# Altium PCB Secondary-Board-v1.0.PcbDoc (part 1 of 3)
Units mm, origin at the board's own origin, x right, y up, seen from the top; angles counter-clockwise.
Board outline 160 x 120 mm, 4 copper layers (Top Layer, GND, PWR, Bottom Layer), stack 1.566 mm thick; 110 components, 60 nets, 340 pads, 181 vias.
Unrouted connection lines stored in the file: 32.
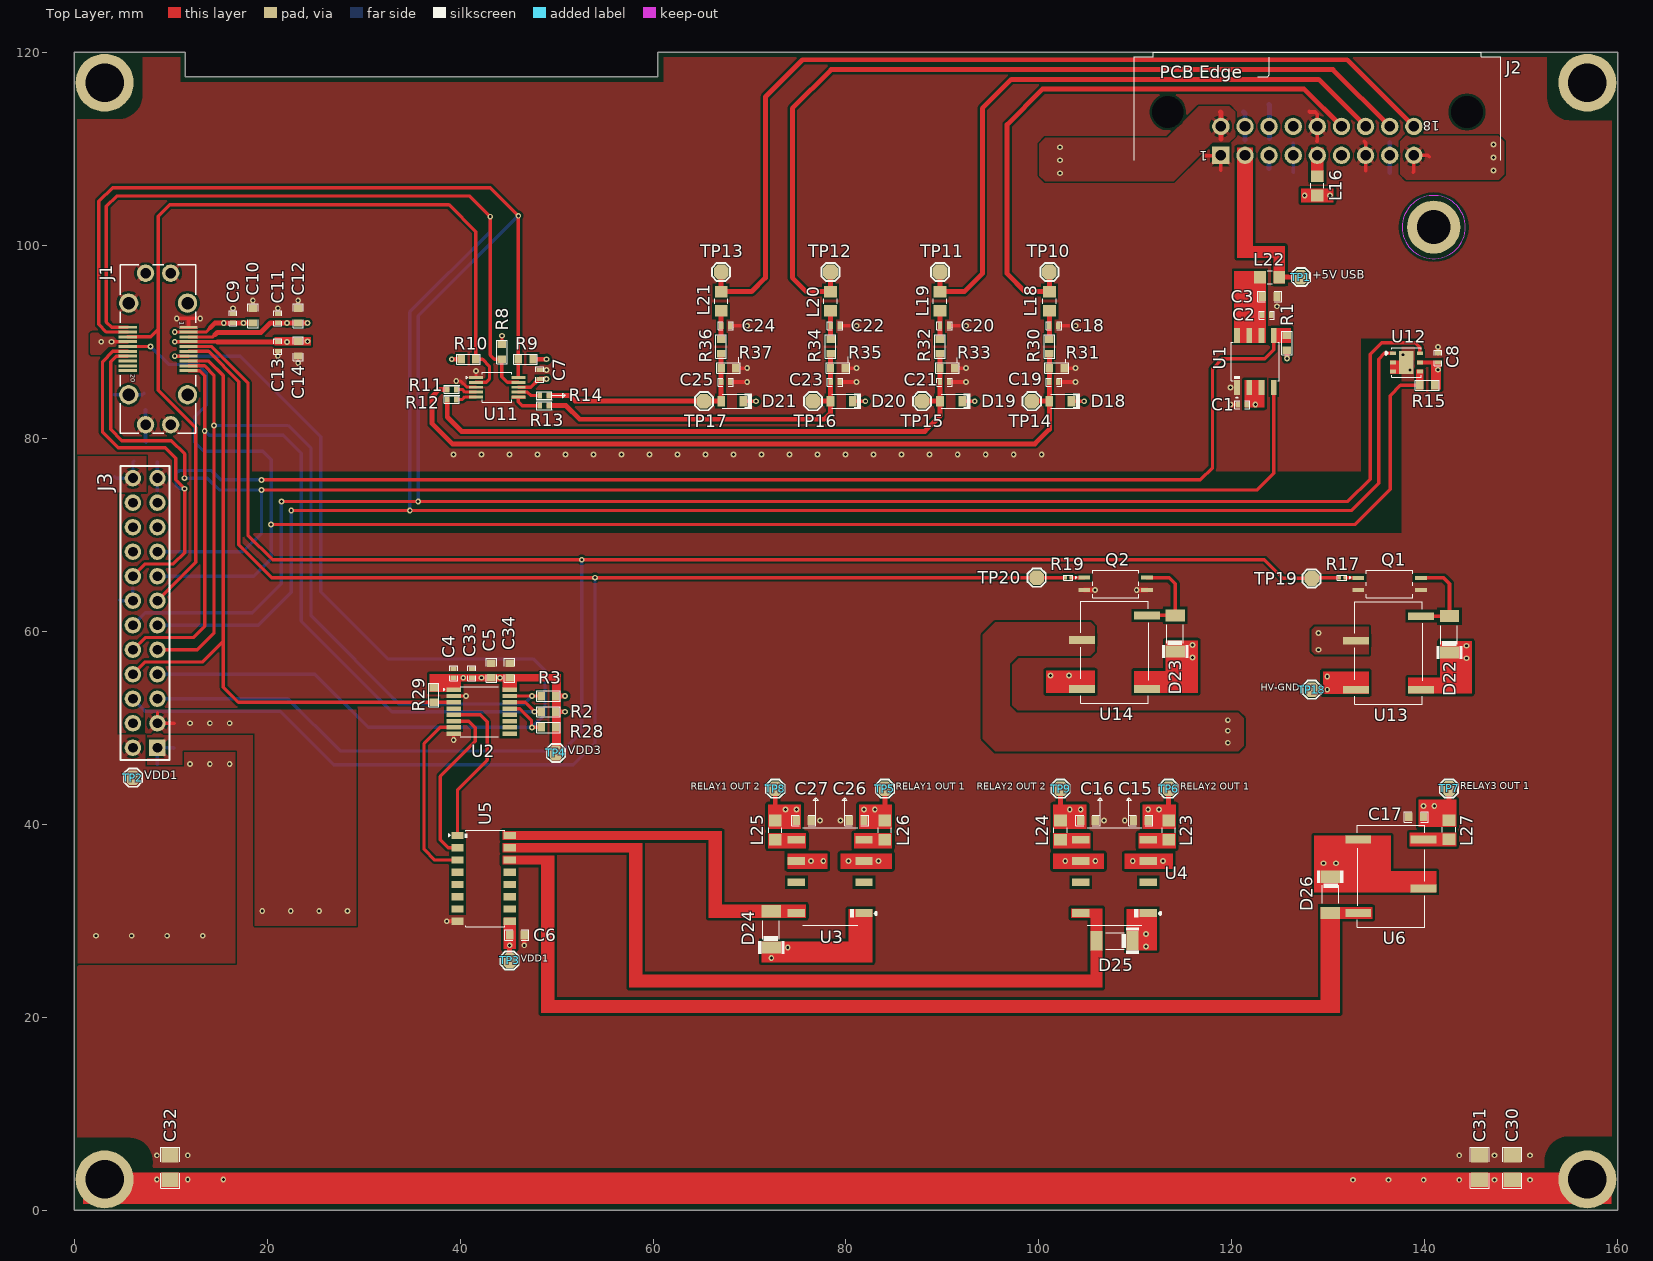
[diagram p0: Top Layer view]
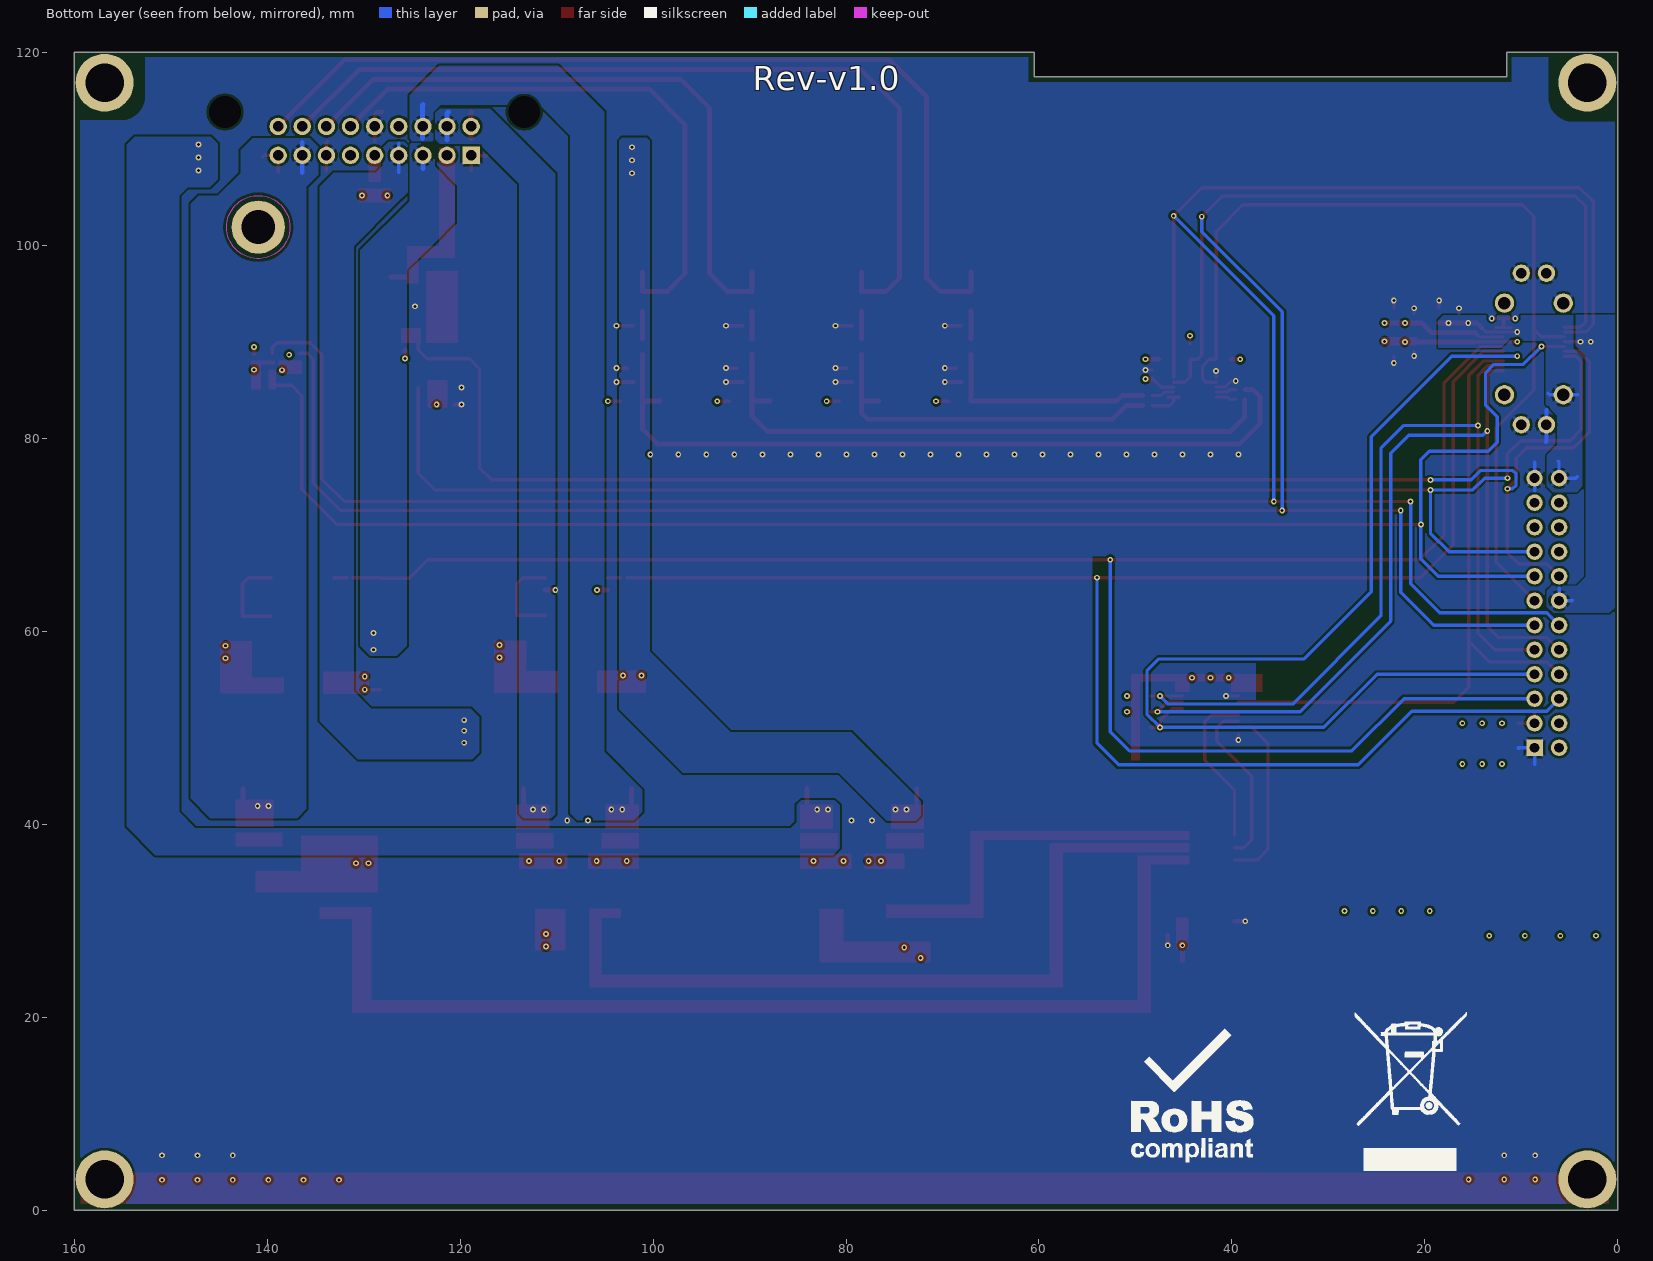
[diagram p1: Bottom Layer view, seen from below]
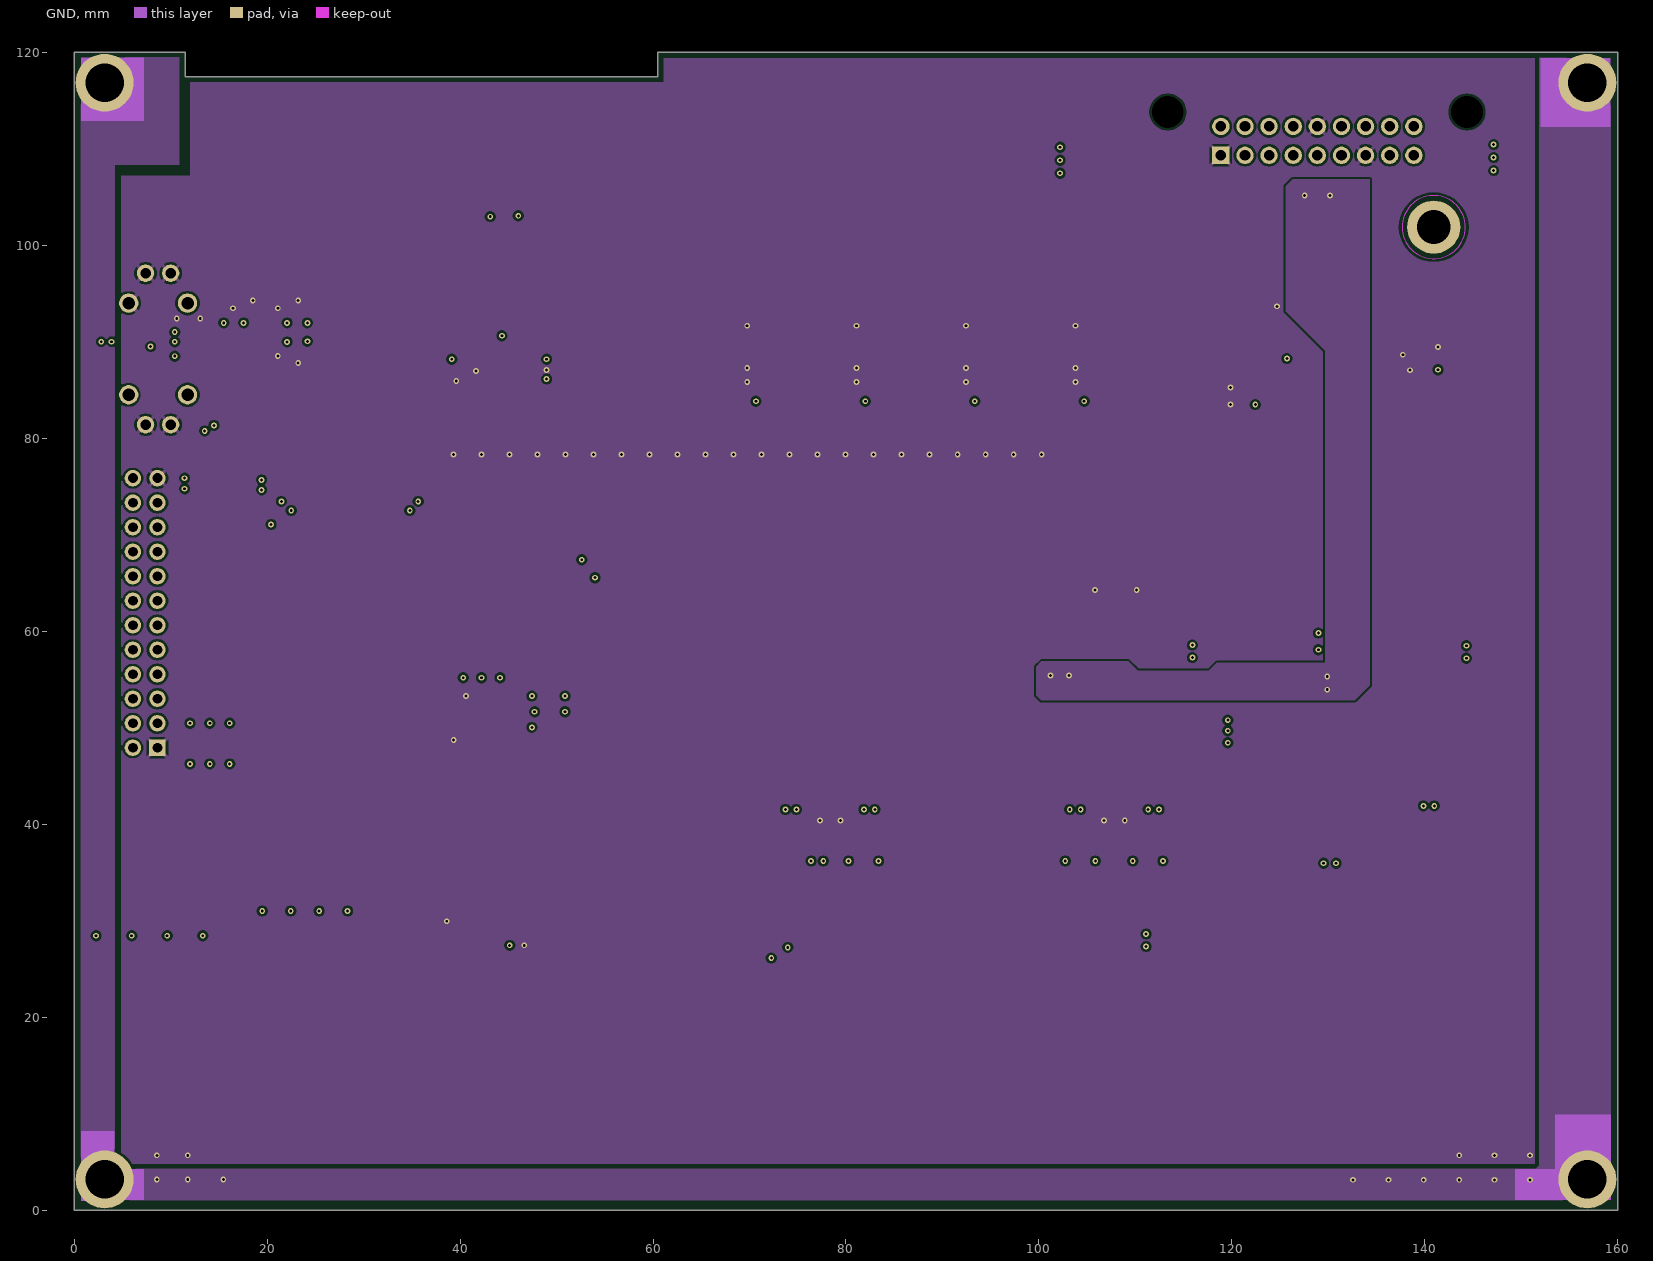
[diagram p2: GND]
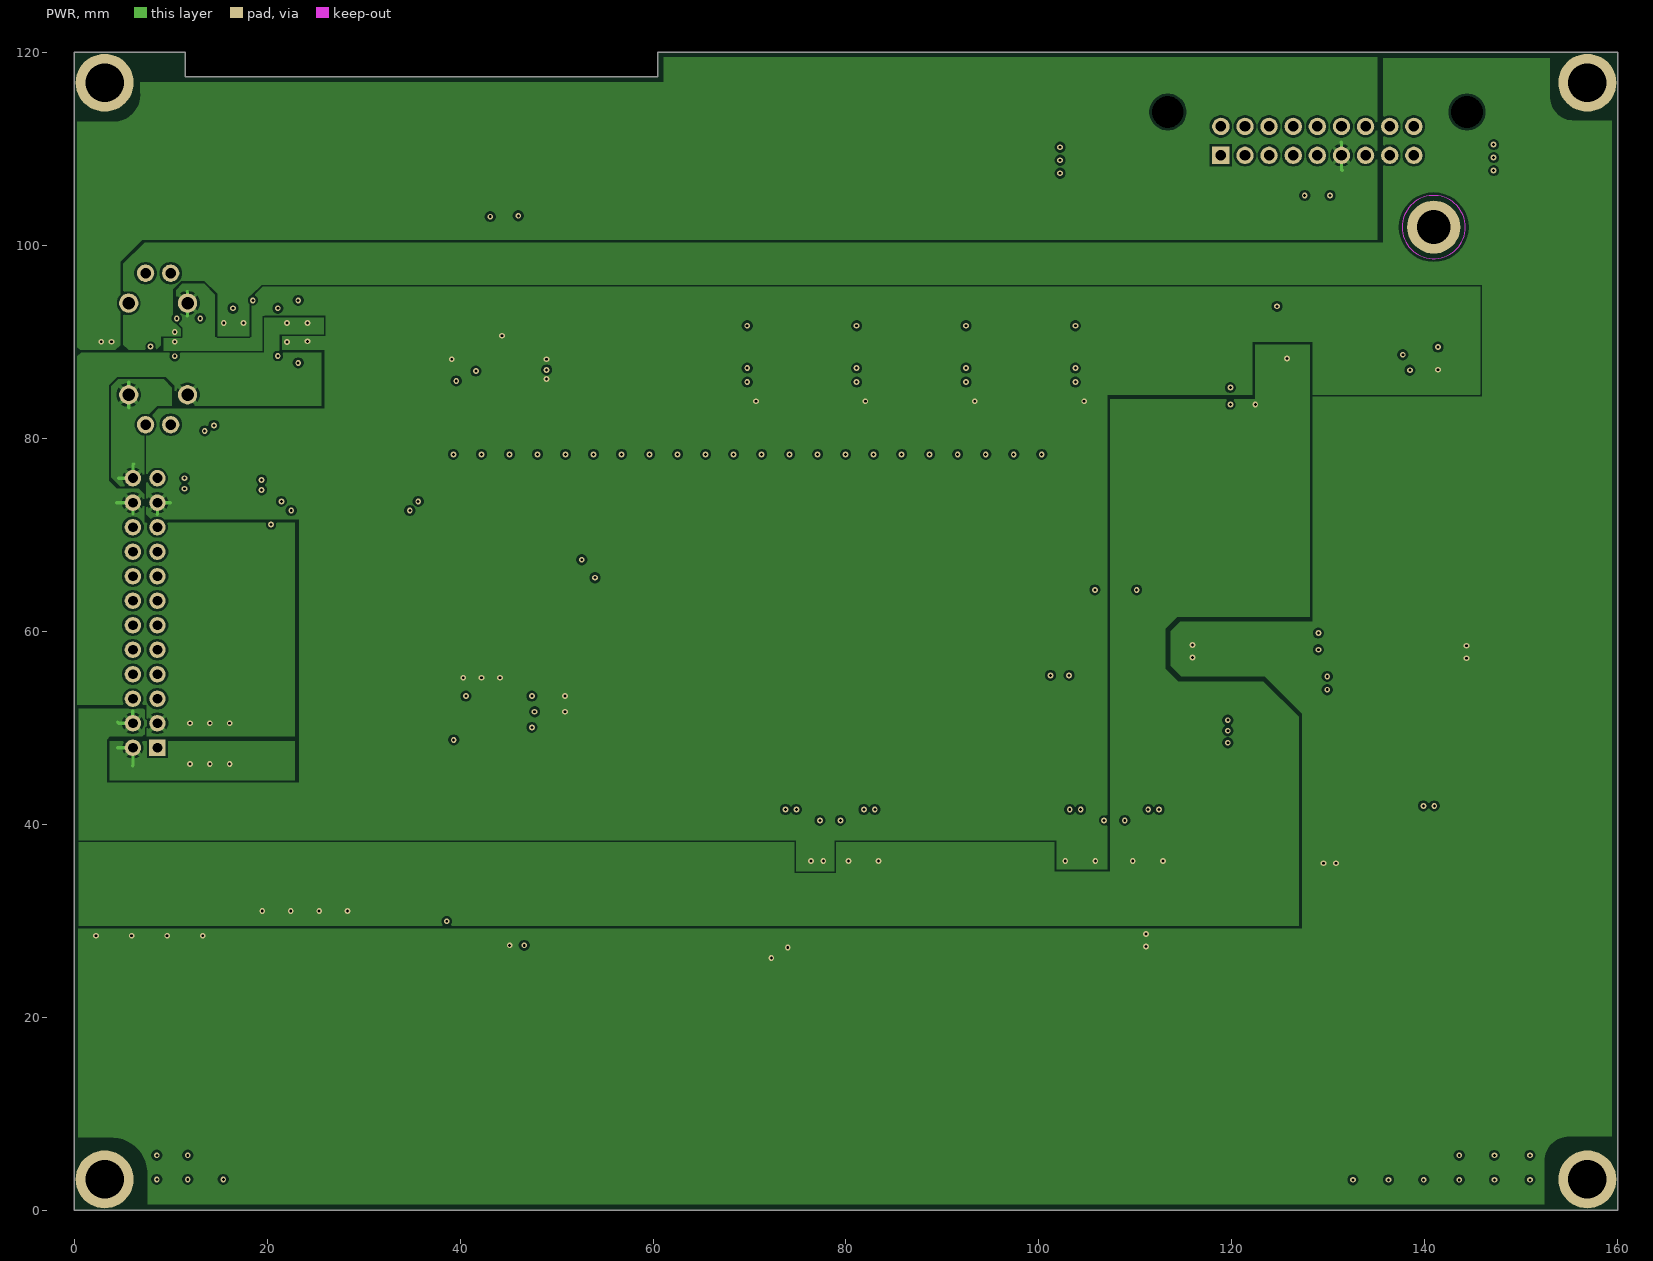
[diagram p3: PWR]
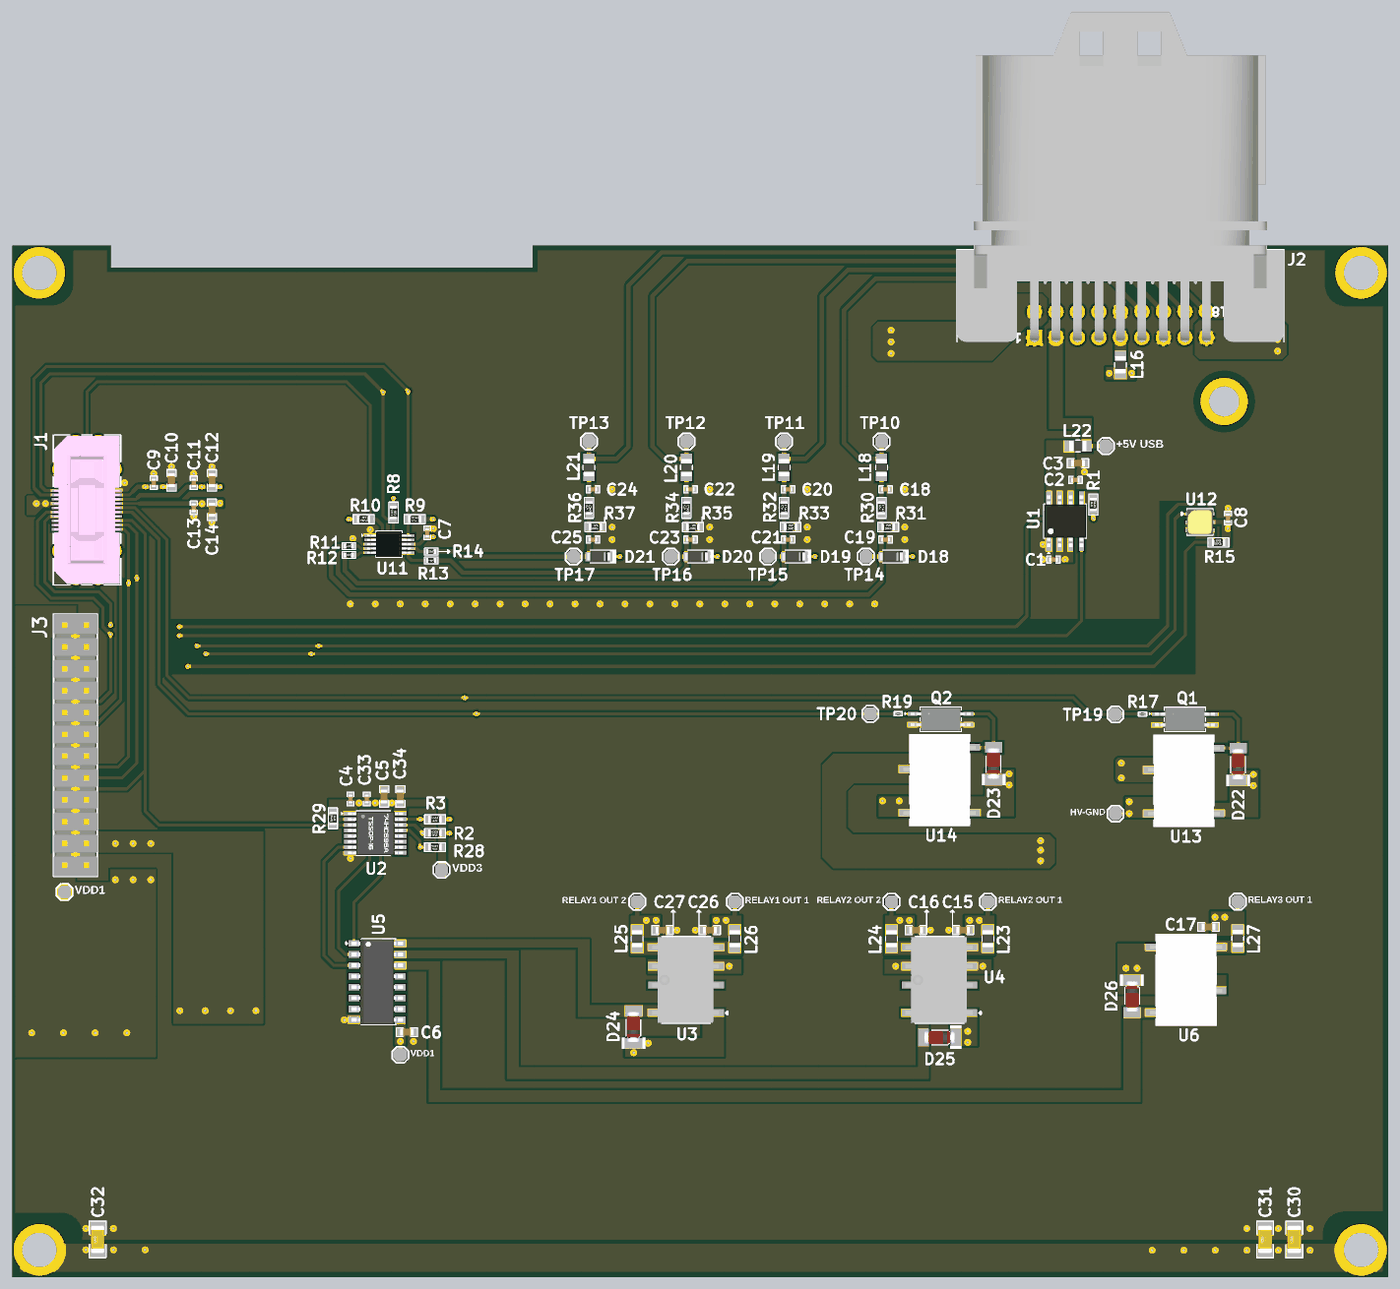
[diagram p5: 3D render of the assembled board from above, using the file's embedded part models]

## Layer stack, top to bottom
Top Solder: solder mask 0.0203, Solder Resist, Dk 3.5
Top Layer: signal copper 0.035
Dielectric 2: prepreg 0.203, PP-022, Dk 4.4
GND: signal copper 0.03
Dielectric 1: core 1.03, FR-4, Dk 4.6
PWR: signal copper 0.03
Dielectric 3: prepreg 0.203, PP-022, Dk 4.4
Bottom Layer: signal copper 0.035
Bottom Solder: solder mask 0.0203, Solder Resist, Dk 3.5

## Board outline
0,0 0,120 11.5,120 11.5,117.45 60.5,117.45 60.5,120 160,120 160,0

## Design rules (kind name [scope] priority, off if disabled: settings)
Clearance [All] p1: gap=0.254 ignorepadtopadclearanceinfootprint=TRUE except(0: Arc-Hole Track-Hole SMDPad-Hole THPad-Hole Via-Hole Fill-Hole Poly-Hole Region-Hole Text-Hole; 0.127: Track-Track Track-SMDPad Track-Fill SMDPad-Fill; 0.178: SMDPad-SMDPad; 0.203: Track-THPad Poly-Poly)
HoleSize [All] p1: absolutevalues=TRUE maxlimit=5.08 minlimit=0.025 maxpercent=80.000 minpercent=20.000
MinimumSolderMaskSliver [All] p1: minsoldermaskwidth=0
PolygonConnect [All] p1: thpad.connectstyle=Relief thpad.reliefconductorwidth=0.381 thpad.reliefentries=4 thpad.polygonreliefangle="45 Angle" thpad.airgapwidth=0.254 smdpad.connectstyle=Direct smdpad.reliefconductorwidth=0.381 smdpad.reliefentries=4 smdpad.polygonreliefangle="45 Angle" smdpad.airgapwidth=0.254 via.connectstyle=Direct via.reliefconductorwidth=0.381 via.reliefentries=4 via.polygonreliefangle="45 Angle" via.airgapwidth=0.254
RoutingVias [All] p1: holewidth=0.3 width=0.6 viastyle="Through Hole" minholewidth=0.3 minwidth=0.6 maxholewidth=0.3 maxwidth=0.6
SilkToSilkClearance [All] p1: silktosilkclearance=0
SilkToSolderMaskClearance [IsPad] p1: minsilkscreentomaskgap=0 clearancetoexposedcopper=TRUE
SolderMaskExpansion [All] p1: expansion=0.102 istentingtop=FALSE
UnRoutedNet [All] p1: checkbadconnections=TRUE
Width [All] p1: maxlimit=1.27 minlimit=0.254 preferedwidth=0.345 minimp=50.000000 maximp=50.000000 favimp=50.000000
25 further rules are at their usual default settings.

## Classes and differential pairs
component class U_TEMP-HUMIDITY: C7 C8 C18 C19 C20 C21 C22 C23 C24 C25 D18 D19 D20 D21 L18 L19 L20 L21 R8 R9 R10 R11 R12 R13 R14 R15 R30 R31 R32 R33 R34 R35 R36 R37 TP10 TP11 TP12 TP13 TP14 TP15 TP16 TP17 U11 U12
component class U_ISOLATED-RELAYS: C30 C31 C32 D22 D23 Q1 Q2 R17 R19 TP18 TP19 TP20 U13 U14
component class U_I2C-To-GPIO-Expander: C4 C5 C6 C15 C16 C17 C26 C27 C33 C34 D24 D25 D26 L23 L24 L25 L26 L27 R2 R3 R28 R29 TP4 TP5 TP6 TP7 TP8 TP9 U2 U3 U4 U5 U6
component class U_Connector-USB-Current-Limit: C1 C2 C3 C9 C10 C11 C12 C13 C14 J1 J2 J3 L16 L22 R1 TP1 TP2 TP3 U1

## Components (designator, comment, footprint, x,y, rotation, side; value= is the part's Value field where it differs from the comment)
C1 "0.1uF" Cap-0402 121.063,83.47 r0 top value=100nF
C2 "0.1uF" Cap-0402 123.616,92.741 r180 top value=100nF
C3 "22uF" Cap-0603 123.908,94.671 r180 top
C4 "0.1uF" Cap-0402 39.34,55.626 r270 top value=100nF
C5 "1uF" Cap-0603 43.249,55.918 r270 top
C6 "0.1uF" Cap-0603 45.898,28.499 r0 top value=100nF
C7 "0.1uF" Cap-0402 48.26,86.588 r90 top value=100nF
C8 "0.1uF" Cap-0402 141.351,88.303 r90 top value=100nF
C9 "0.1uF" Cap-0402 16.472,92.401 r270 top value=100nF
C10 "1uF" Cap-0603 18.529,92.693 r270 top
C11 "0.1uF" Cap-0402 21.12,92.401 r270 top value=100nF
C12 "1uF" Cap-0603 23.228,92.693 r270 top
C13 "0.1uF" Cap-0402 21.12,89.497 r90 top value=100nF
C14 "1uF" Cap-0603 23.228,89.264 r90 top
C15 "0.1uF" Cap-0603 110.556,40.369 r180 top value=100nF
C16 "0.1uF" Cap-0603 105.08,40.369 r0 top value=100nF
C17 "0.1uF" Cap-0603 139.082,40.742 r180 top value=100nF
C18 "0.1uF" Cap-0402 101.548,91.643 r180 top value=100nF
C19 "0.1uF" Cap-0402 101.548,85.801 r180 top value=100nF
C20 "0.1uF" Cap-0402 90.208,91.643 r180 top value=100nF
C21 "0.1uF" Cap-0402 90.208,85.801 r180 top value=100nF
C22 "DNP" Cap-0402 78.868,91.643 r180 top value=100nF
C23 "DNP" Cap-0402 78.868,85.801 r180 top value=100nF
C24 "DNP" Cap-0402 67.529,91.643 r180 top value=100nF
C25 "DNP" Cap-0402 67.529,85.801 r180 top value=100nF
C26 "0.1uF" Cap-0603 81.097,40.369 r180 top value=100nF
C27 "0.1uF" Cap-0603 75.621,40.369 r0 top value=100nF
C30 "1nF" Cap-1206 149.053,4.394 r90 top
C31 "DNP" Cap-1206 145.669,4.394 r90 top value=1nF
C32 "DNP" Cap-1206 9.957,4.394 r90 top value=1nF
C33 "0.1uF" Cap-0402 41.231,55.626 r270 top value=100nF
C34 "1uF" Cap-0603 45.14,55.918 r270 top
D18 "RRE07VTM6SFHTR" TUMD2SM 102.228,83.82 r180 top
D19 "RRE07VTM6SFHTR" TUMD2SM 90.888,83.82 r180 top
D20 "RRE07VTM6SFHTR" TUMD2SM 79.548,83.82 r180 top
D21 "RRE07VTM6SFHTR" TUMD2SM 68.209,83.82 r180 top
D22 "LL4148-GS08" "SOD-80 MiniMELF" 142.545,59.669 r90 top
D23 "LL4148-GS08" "SOD-80 MiniMELF" 114.122,59.745 r90 top
D24 "LL4148-GS08" "SOD-80 MiniMELF" 72.263,29.088 r90 top
D25 "LL4148-GS08" "SOD-80 MiniMELF" 107.823,27.915 r180 top
D26 "LL4148-GS08" "SOD-80 MiniMELF" 130.175,32.66 r270 top
J1 "FX23-20S-0.5SV" FX23-20S-0.5SV 8.712,89.235 r270 top locked
J2 "MX23A18NF1" MX23A18NF1 113.348,113.8 r180 top locked
J3 "TSW-112-15-G-D" TSW-112-15-G-D 7.366,61.874 r90 top locked
L16 "BLM21SP601SH1D" Ind-0805 128.848,106.137 r90 top
L18 "MPZ2012S102AT000" Ind-0805 101.078,94.174 r270 top
L19 "MPZ2012S102AT000" Ind-0805 89.738,94.174 r270 top
L20 "DNP" Ind-0805 78.398,94.174 r270 top
L21 "DNP" Ind-0805 67.059,94.174 r270 top
L22 "BLM21SP601SH1D" Ind-0805 123.908,96.678 r0 top
L23 "BLM21AG121SZ1D" Ind-0805 113.436,39.369 r90 top value=90mR
L24 "BLM21AG121SZ1D" Ind-0805 102.235,39.369 r90 top value=90mR
L25 "BLM21AG121SZ1D" Ind-0805 72.669,39.369 r90 top value=90mR
L26 "BLM21AG121SZ1D" Ind-0805 84.023,39.369 r90 top value=90mR
L27 "BLM21AG121SZ1D" Ind-0805 142.494,39.405 r90 top value=90mR
Q1 "TLX9000(TPL,F" "4-SOIC (0.179\", 4.55mm Width)" 136.34,64.872 r0 top
Q2 "TLX9000(TPL,F" "4-SOIC (0.179\", 4.55mm Width)" 107.951,64.897 r0 top
R1 "DNP" Res-0603 125.698,89.871 r270 top value=10kR
R2 "10K" Res-0603 49.174,51.638 r0 top value=10kR
R3 "10K" Res-0603 49.174,53.263 r0 top value=10kR
R8 "10K" Res-0603 44.34,88.933 r90 top value=10kR
R9 "10K" Res-0603 46.802,88.171 r0 top value=10kR
R10 "10K" Res-0603 40.876,88.171 r180 top value=10kR
R11 "0R" Res-0402 39.141,85.039 r180 top value=0mR
R12 "0R" Res-0402 39.141,83.998 r180 top value=0mR
R13 "0R" Res-0402 48.73,83.363 r0 top value=0mR
R14 "0R" Res-0402 48.73,84.418 r0 top value=0mR
R15 "10K" Res-0603 140.236,85.471 r180 top value=10kR
R17 "330R" Res-0201 131.417,65.507 r0 top
R19 "330R" Res-0201 103.028,65.532 r0 top
R28 "10K" Res-0603 49.174,50.013 r0 top value=10kR
R29 "10K" Res-0603 37.286,53.375 r90 top value=10kR
R30 "47K" Res-0603 101.078,89.484 r270 top value=47kR
R31 "10K" Res-0603 101.84,87.249 r180 top value=10kR
R32 "47K" Res-0603 89.738,89.484 r270 top value=47kR
R33 "10K" Res-0603 90.5,87.249 r180 top value=10kR
R34 "DNP" Res-0603 78.398,89.484 r270 top value=47kR
R35 "DNP" Res-0603 79.16,87.249 r180 top value=10kR
R36 "DNP" Res-0603 67.059,89.484 r270 top value=47kR
R37 "DNP" Res-0603 67.821,87.249 r180 top value=10kR
TP1 "TEST POINT" Test-point 127.146,96.678 r90 top
TP2 "TEST POINT" Test-point 6.096,44.806 r0 top
TP3 "TEST POINT" Test-point 45.143,25.857 r270 top
TP4 "TEST POINT" Test-point 49.936,47.371 r0 top
TP5 "TEST POINT" Test-point 84.023,43.663 r0 top
TP6 "TEST POINT" Test-point 113.436,43.663 r0 top
TP7 "TEST POINT" Test-point 142.494,43.688 r0 top
TP8 "TEST POINT" Test-point 72.669,43.663 r0 top
TP9 "TEST POINT" Test-point 102.235,43.663 r0 top
TP10 "TEST POINT" Test-point 101.078,97.206 r90 top
TP11 "TEST POINT" Test-point 89.738,97.206 r180 top
TP12 "TEST POINT" Test-point 78.398,97.206 r180 top
TP13 "TEST POINT" Test-point 67.059,97.206 r180 top
TP14 "TEST POINT" Test-point 99.249,83.82 r90 top
TP15 "TEST POINT" Test-point 87.884,83.82 r180 top
TP16 "TEST POINT" Test-point 76.581,83.82 r180 top
TP17 "TEST POINT" Test-point 65.278,83.82 r180 top
TP18 "TEST POINT" Test-point 128.27,53.924 r90 top
TP19 "TEST POINT" Test-point 128.253,65.456 r90 top
TP20 "TEST POINT" Test-point 99.764,65.532 r90 top
U1 "TPS2024IDRQ1" SOIC-8 122.422,87.933 r90 top
U2 "TCA6408AQPWRQ1" TSSOP_16 42.24,51.638 r0 top
U3 "G6K-2F-Y DC12" "G6K-2F-Y DC12" 78.359,34.569 r180 top
U4 "G6K-2F-Y DC12" "G6K-2F-Y DC12" 107.818,34.569 r180 top
U5 "TPL7407LADR" 16-SOIC 42.443,34.366 r0 top
U6 "G6L-1FDC12" G6L-1FDC12 136.474,34.595 r180 top
U11 "ADS1015IDGSR" 10-VSSOP 43.84,85.268 r0 top
U12 "HDC2021DEBT" HDC2021DEBT 138.074,87.833 r0 top
U13 "G6L-1FDC12" G6L-1FDC12 136.22,57.734 r0 top
U14 "G6L-1FDC12" G6L-1FDC12 107.831,57.81 r0 top

## Footprints (in the part's own frame and the unit in brackets; to place one, negate y for a bottom-side part, rotate by r counter-clockwise, add the part's x,y. Pads: shape width x height; smd on the part's side, far side on the other; paste and mask are expansions set on the pad)
"4-SOIC (0.179\", 4.55mm Width)" [mm]
  rect 1.211x0.431 smd: 1(-3.25,0.635) 2(-3.25,-0.635) 3(3.25,-0.635) 4(3.25,0.635)
  silkscreen extent -4.14,-1.43 2.4,1.43, body extent -3.5,-1.3 3.5,1.3, height 2.6
10-VSSOP [mm]
  rect 1.45x0.3 smd: 1(-2.2,1) 2(-2.2,0.5) 3(-2.2,0) 4(-2.2,-0.5) 5(-2.2,-1) 6(2.2,-1) 7(2.2,-0.5) 8(2.2,0) 9(2.2,0.5) 10(2.2,1)
  silkscreen extent -3.17,-1.55 1.52,1.55, body extent -2.56,-1.5 2.51,1.5, height 1.09
16-SOIC [mm]
  rect 1.27x0.76 smd: 1(-2.7,4.445) 2(-2.7,3.175) 3(-2.7,1.905) 4(-2.7,0.635) 5(-2.7,-0.635) 6(-2.7,-1.905) 7(-2.7,-3.175) 8(-2.7,-4.445) 9(2.7,-4.445) 10(2.7,-3.175) 11(2.7,-1.905) 12(2.7,-0.635) 13(2.7,0.635) 14(2.7,1.905) 15(2.7,3.175) 16(2.7,4.445)
  silkscreen extent -3.61,-5 2.18,5, body extent -3,-4.95 3,4.95, height 1.75
Cap-0402 [mil]
  rect 18x25 smd mask+2.36: 1(-18.5,0) 2(18.5,0)
  silkscreen extent -31,-16 31,16, body extent -20,-10 20,10, height 19
Cap-0603 [mil]
  rect 30x35 smd mask+2.36: 1(-30,0) 2(30,0)
  silkscreen extent -49,-21 49,21, body extent -32,-16 31,16, height 34
Cap-1206 [mil] "SMD 1206"
  rect 60x70 smd: 1(-50,0) 2(50,0)
  silkscreen extent -84,-39 84,39, body extent -63,-31 63,32, height 39
FX23-20S-0.5SV [mm]
  rect 0.305x1.905 smd: 1(-2.25,3.15) 2(-1.75,3.15) 3(-1.25,3.15) 4(-0.75,3.15) 5(-0.25,3.15) 6(0.25,3.15) 7(0.75,3.15) 8(1.25,3.15) 9(1.75,3.15) 10(2.25,3.15) 11(-2.25,-3.15) 12(-1.75,-3.15) 13(-1.25,-3.15) 14(-0.75,-3.15) 15(-0.25,-3.15) 16(0.25,-3.15) 17(0.75,-3.15) 18(1.25,-3.15) 19(1.75,-3.15) 20(2.25,-3.15)
  round 2 hole 1.295: P1(-4.75,3.05) P2(4.75,3.05) P3(-4.75,-3.05) P4(4.75,-3.05)
  round 1.8 hole 1.092: SH1(-7.85,1.3) SH2(7.85,1.3) SH3(-7.85,-1.3) SH4(7.85,-1.3)
  silkscreen extent -8.72,-3.92 8.72,3.92, body extent -8.6,-3.8 8.6,3.8, height 6.8
"G6K-2F-Y DC12" [mm]
  rect 1.8x0.8 smd: 1(-3.5,3.8) 2(-3.5,0.6) 3(-3.5,-1.6) 4(-3.5,-3.8) 5(3.5,-3.8) 6(3.5,-1.6) 7(3.5,0.6) 8(3.5,3.8)
  silkscreen extent -4.78,-5.05 2.82,5.05, body extent -3.84,-5 3.96,5, height 5.2
G6L-1FDC12 [mm]
  rect 2.66x0.8 smd: 2(-3.37,1.27) 4(-3.37,-3.81) 5(3.37,-3.81) 8(3.37,3.81)
  silkscreen extent -3.5,-5.3 3.51,5.3, body extent -4.2,-5.3 4.2,5.3, height 4.2
HDC2021DEBT [mm]
  rect 0.6x0.4 smd: 1(-1.4,0.95) 2(-1.4,0) 3(-1.4,-0.95) 4(1.4,-0.95) 5(1.4,0) 6(1.4,0.95)
  rect 1.5x2.4 smd: 7(0,0)
  silkscreen extent -2.11,-1.55 1.52,1.55, body extent -1.5,-1.5 1.5,1.5, height 0.87
Ind-0805 [mm] "Inductor 0805"
  rect 1.2x1.32 smd: 1(-1,0) 2(1,0)
  silkscreen extent -0.25,-0.69 0.25,0.69, body extent -1,-0.62 1,0.63, height 0.47
MX23A18NF1 [mm]
  rect 1.8x1.8 hole 1.1: 1(-5.5,4.5)
  round 1.8 hole 1.1: 2(-8,4.5) 3(-10.5,4.5) 4(-13,4.5) 5(-15.5,4.5) 6(-18,4.5) 7(-20.5,4.5) 8(-23,4.5) 9(-25.5,4.5) 10(-5.5,1.5) 11(-8,1.5) 12(-10.5,1.5) 13(-13,1.5) 14(-15.5,1.5) 15(-18,1.5) 16(-20.5,1.5) 17(-23,1.5) 18(-25.5,1.5)
  round 0 hole 3.3 unplated: ""(-31,0) ""(0,0)
  silkscreen extent -34.5,-6.2 3.5,5, body extent -34.49,-33.3 3.51,5, height 18.45
Res-0201 [mm]
  rect 0.27x0.37 smd mask+0.055: 1(-0.275,0) 2(0.275,0)
  silkscreen extent -0.48,-0.25 0.48,0.25, body extent -0.3,-0.15 0.3,0.15, height 0.29
Res-0402 [mil]
  rect 18x25 smd mask+2.17: 1(-18.5,0) 2(18.5,0)
  silkscreen extent -32,-17 32,16, body extent -23,-11 23,11, height 16
Res-0603 [mil]
  rect 30x35 smd: 1(-30,0) 2(30,0)
  silkscreen extent -48,-21 48,21, body extent -31,-17 31,17, height 18
"SOD-80 MiniMELF" [mm]
  rect 1.25x2 smd mask+0.055: 1(-1.875,0) 2(1.875,0)
  silkscreen extent -2.54,-1.37 0.89,1.37, body extent -1.75,-0.76 1.75,0.83, height 1.54
SOIC-8 [mm]
  rect 1.55x0.6 smd: 1(-2.7,1.905) 2(-2.7,0.635) 3(-2.7,-0.635) 4(-2.7,-1.905) 5(2.7,-1.905) 6(2.7,-0.635) 7(2.7,0.635) 8(2.7,1.905)
  silkscreen extent -3.76,-2.49 1.99,2.49, body extent -3,-2.45 3,2.45, height 1.7
Test-point [mil]
  oct 60x60 smd: 1(0,0)
  silkscreen extent -37,-37 37,37
TSSOP_16 [mm]
  rect 1.5x0.45 smd: 1(-2.9,2.275) 2(-2.9,1.625) 3(-2.9,0.975) 4(-2.9,0.325) 5(-2.9,-0.325) 6(-2.9,-0.975) 7(-2.9,-1.625) 8(-2.9,-2.275) 9(2.9,-2.275) 10(2.9,-1.625) 11(2.9,-0.975) 12(2.9,-0.325) 13(2.9,0.325) 14(2.9,0.975) 15(2.9,1.625) 16(2.9,2.275)
  silkscreen extent -3.93,-2.61 1.73,2.61, body extent -3.2,-2.55 3.2,2.55, height 1.23
TSW-112-15-G-D [mm]
  rect 1.7x1.7 hole 1.02: 1(-13.97,-1.27)
  round 1.7 hole 1.02: 2(-13.97,1.27) 3(-11.43,-1.27) 4(-11.43,1.27) 5(-8.89,-1.27) 6(-8.89,1.27) 7(-6.35,-1.27) 8(-6.35,1.27) 9(-3.81,-1.27) 10(-3.81,1.27) 11(-1.27,-1.27) 12(-1.27,1.27) 13(1.27,-1.27) 14(1.27,1.27) 15(3.81,-1.27) 16(3.81,1.27) 17(6.35,-1.27) 18(6.35,1.27) 19(8.89,-1.27) 20(8.89,1.27) 21(11.43,-1.27) 22(11.43,1.27) 23(13.97,-1.27) 24(13.97,1.27)
  silkscreen extent -15.24,-2.54 15.24,2.54, body extent -15.24,-2.54 15.24,2.54, height 15.75
TUMD2SM [mm]
  rect 0.8x1.1 smd: 1(-1.15,0) 2(1.15,0)
  silkscreen extent -2.03,-0.79 1.02,0.79, body extent -1.35,-0.7 1.35,0.7, height 0.82

## Part data
C1 C2 C4 C7 C8 C9 C11 C13 C18 C19 C20 C21 C22 C23 C24 C25 C33: library part GRM155R71C104KA88J, "CAP CER 0.1UF 16V X7R 0402", Case Code (Imperial)=0402, Case Code (Metric)=1005, Dielectric=X7R, Manufacturer=Murata, Max Operating Temperature=125°C, Min Operating Temperature=-55°C, Package Quantity=1, Tolerance=10%, Voltage=16V, Case/Package=0402, Category="Ceramic Capacitors", ComponentLink1Description=https://datasheet.ciiva.com/6271/product-6271168.pdf?src-supplier=Digi-Key, ComponentLink1URL=https://datasheet.ciiva.com/6271/product-6271168.pdf?src-supplier=Digi-Key, ComponentLink2Description=https://datasheet.ciiva.com/6271/grm155r71c104ka88-01-6271231.pdf?src-supplier=Digi-Key, ComponentLink2URL=https://datasheet.ciiva.com/6271/grm155r71c104ka88-01-6271231.pdf?src-supplier=Digi-Key, Construction=Flat, Depth=0.5mm, Height=0.5mm, Lead Free="Lead Free", Length=1mm, Manufacturer Part Number=GRM155R71C104KA88J, Material=4241ConductorMaterial, Mounting Technology="Surface Mount", Packaging="Tape and Reel", Pins=2NUMBER, Pricing="50000=0.004, 100000=0.0034, 150000=0.0033 (USD)", Radiation Hardening=No, Reach SVHC Compliant=No, RoHS=Yes, RoHS Compliant=Yes, Series=GRM, Stock=300000, Supplier="Arrow Electronics", Supplier Part Number=GRM155R71C104KA88J, Termination=SMD/SMT, Thickness=0.022inch, Voltage Rating=16V, Voltage Rating (DC)=16V, Width=0.02inch
C3: library part CL10A226MO7JZNC, "CAP CER 22UF 16V X5R 0603", Case Code (Imperial)=0603, Case Code (Metric)=1608, Manufacturer=Samsung, Max Operating Temperature=85°C, Min Operating Temperature=-55°C, Tolerance=20%, Voltage Rating=16V, Case/Package=0603, Category="Ceramic Capacitors", ComponentLink1Description=http://www.samsungsem.com/kr/support/product-search/mlcc/CL10A226MO7JZNC.jsp?src-supplier=Digi-Key, ComponentLink1URL=http://www.samsungsem.com/kr/support/product-search/mlcc/CL10A226MO7JZNC.jsp?src-supplier=Digi-Key, ComponentLink2Description=https://datasheet.octopart.com/CL10A226MO7JZNC-Samsung-Electro-Mechanics-datasheet-149156497.pdf?src-supplier=Future+Electronics, ComponentLink2URL=https://datasheet.octopart.com/CL10A226MO7JZNC-Samsung-Electro-Mechanics-datasheet-149156497.pdf?src-supplier=Future+Electronics, Manufacturer Part Number=CL10A226MO7JZNC, Mounting Technology="Surface Mount", Packaging="Cut Tape", Pricing="4000=0.1372 (USD)", RoHS=Yes, RoHS Compliant=Yes, Series=CL, Stock=1192000, Supplier=Avnet, Supplier Part Number=CL10A226MO7JZNC
C5 C10 C12 C14 C34: library part CGA3E1X7R1E105K080AC, "CAP CER 1UF 25V X7R 0603", Case Code (Imperial)=0603, Case Code (Metric)=1608, Dielectric=X7R, Manufacturer=TDK, Max Operating Temperature=125°C, Min Operating Temperature=-55°C, Package Quantity=1, Ratings=AEC-Q200, Supplier Part Number=7882925P, Tolerance=10%, Voltage=25V, Case/Package=0603, Category="Ceramic Capacitors", ComponentLink1Description=https://datasheet.ciiva.com/24216/cga3e1x7r1e105k080ac-265757-24216362.pdf?src-supplier=Mouser, ComponentLink1URL=https://datasheet.ciiva.com/24216/cga3e1x7r1e105k080ac-265757-24216362.pdf?src-supplier=Mouser, ComponentLink2Description=https://datasheet.ciiva.com/23803/1936565-23803078.pdf?src-supplier=Newark, ComponentLink2URL=https://datasheet.ciiva.com/23803/1936565-23803078.pdf?src-supplier=Newark, ComponentLink3Description=https://datasheet.ciiva.com/46385/1735392-46385705.pdf?src-supplier=Element14, ComponentLink3URL=https://datasheet.ciiva.com/46385/1735392-46385705.pdf?src-supplier=Element14, ComponentLink4Description=https://datasheet.ciiva.com/48573/2288cga3e1x7r1e105k080ac-48573708.pdf?src-supplier=Onlinecomponents.com, ComponentLink4URL=https://datasheet.ciiva.com/48573/2288cga3e1x7r1e105k080ac-48573708.pdf?src-supplier=Onlinecomponents.com, ComponentLink5Description=https://datasheet.ciiva.com/16428/mlccspec-automotive-general-midvoltage-en-16428542.pdf?src-supplier=Future+Electronics, ComponentLink5URL=https://datasheet.ciiva.com/16428/mlccspec-automotive-general-midvoltage-en-16428542.pdf?src-supplier=Future+Electronics, Depth=0.8mm, Height=0.8mm, Lead Free="Lead Free", Length=1.6mm, Manufacturer Part Number=CGA3E1X7R1E105K080AC, Material=4241ConductorMaterial, Mounting Technology="Surface Mount", Packaging="Tape and Reel", Pricing="800=0.027, 2000=0.026 (GBP)", Reach SVHC Compliant=No, RoHS=Yes, RoHS Compliant=Yes, Series=CGA, Stock=80700, Supplier=Rs, Termination=SMD/SMT, Thickness=0.035inch, Voltage Rating=25V, Voltage Rating (DC)=25V, Weight=7.1E-05oz, Width=0.031inch
C6 C15 C16 C17 C26 C27: library part GRM188R72A104KA35D, "CAP CER 0.1UF 100V X7R 0603", Case Code (Imperial)=0603, Case Code (Metric)=1608, Dielectric=X7R, Manufacturer=Murata, Max Operating Temperature=125°C, Min Operating Temperature=-55°C, Package Quantity=1, Tolerance=10%, Voltage=100V, Case/Package=0603, Category="Ceramic Capacitors", ComponentLink1Description=https://datasheet.ciiva.com/18100/getdatasheetpartid-27818-18100710.pdf?src-supplier=Verical, ComponentLink1URL=https://datasheet.ciiva.com/18100/getdatasheetpartid-27818-18100710.pdf?src-supplier=Verical, ComponentLink2Description=https://datasheet.ciiva.com/22703/1747473-22703345.pdf?src-supplier=Element14, ComponentLink2URL=https://datasheet.ciiva.com/22703/1747473-22703345.pdf?src-supplier=Element14, ComponentLink3Description=https://datasheet.ciiva.com/34302/1857815-34302863.pdf?src-supplier=Jameco, ComponentLink3URL=https://datasheet.ciiva.com/34302/1857815-34302863.pdf?src-supplier=Jameco, ComponentLink4Description=https://datasheet.ciiva.com/11787/0900766b80ef921d-11787064.pdf?src-supplier=Rs, ComponentLink4URL=https://datasheet.ciiva.com/11787/0900766b80ef921d-11787064.pdf?src-supplier=Rs, ComponentLink5Description=https://datasheet.ciiva.com/29201/451984-da-01-en-vs-kondensator-0603-29201725.pdf?src-supplier=Conrad, ComponentLink5URL=https://datasheet.ciiva.com/29201/451984-da-01-en-vs-kondensator-0603-29201725.pdf?src-supplier=Conrad, ComponentLink6Description=https://datasheet.ciiva.com/7937/1747473-7937676.pdf?src-supplier=Element14, ComponentLink6URL=https://datasheet.ciiva.com/7937/1747473-7937676.pdf?src-supplier=Element14, ComponentLink7Description=https://datasheet.ciiva.com/135/partnumbering-e-01-135140.pdf?src-supplier=Digi-Key, ComponentLink7URL=https://datasheet.ciiva.com/135/partnumbering-e-01-135140.pdf?src-supplier=Digi-Key, ComponentLink8Description=https://datasheet.ciiva.com/135/partnumbering-e-01-135139.pdf?src-supplier=Digi-Key, ComponentLink8URL=https://datasheet.ciiva.com/135/partnumbering-e-01-135139.pdf?src-supplier=Digi-Key, ComponentLink9Description=https://datasheet.ciiva.com/135/partnumbering-e-01-135141.pdf?src-supplier=Digi-Key, ComponentLink9URL=https://datasheet.ciiva.com/135/partnumbering-e-01-135141.pdf?src-supplier=Digi-Key, ComponentLink10Description=https://datasheet.ciiva.com/16382/product-16382965.pdf?src-supplier=Future+Electronics, ComponentLink10URL=https://datasheet.ciiva.com/16382/product-16382965.pdf?src-supplier=Future+Electronics, Construction=Flat, Depth=0.8mm, Height=0.8mm, Lead Free="Lead Free", Length=1.6mm, Manufacturer Part Number=GRM188R72A104KA35D, Material=Ceramic, Mounting Technology="Surface Mount", Packaging="Tape and Reel", Pricing="1=0.1781, 10=0.0788, 25=0.078, 100=0.0455, 250=0.045, 500=0.0427, 1000=0.0376, 3000=0.0371, 6000=0.0368, 15000=0.0319 (USD)", Radiation Hardening=No, Reach SVHC Compliant=No, RoHS=Yes, RoHS Compliant=Yes, Series=GRM, Size=0.8mm, Stock=28393, Supplier="Arrow Electronics", Supplier Part Number=GRM188R72A104KA35D, Termination=SMD/SMT, Thickness=0.035inch, Voltage Rating=100V, Voltage Rating (DC)=100V, Weight=0.000222oz, Width=0.031inch
C30 C31 C32: library part CL31B102KJHNNNE, "CAP CER 1000PF 2KV X7R 1206", Case Code (Imperial)=1206, Case Code (Metric)=3216, Dielectric=X7R, Manufacturer=Samsung, Max Operating Temperature=125°C, Min Operating Temperature=-55°C, Package Quantity=1, Tolerance=10%, Voltage=200V, Voltage Rating=2kV, Case/Package=1206, Category="Ceramic Capacitors", ComponentLink1Description=https://datasheet.ciiva.com/25727/cl31b102kjhnnne-25727529.pdf?src-supplier=Digi-Key, ComponentLink1URL=https://datasheet.ciiva.com/25727/cl31b102kjhnnne-25727529.pdf?src-supplier=Digi-Key, ComponentLink2Description=https://datasheet.ciiva.com/26838/getdatasheetpartid-358436-26838883.pdf?src-supplier=Verical, ComponentLink2URL=https://datasheet.ciiva.com/26838/getdatasheetpartid-358436-26838883.pdf?src-supplier=Verical, Construction=Flat, Depth=1.6mm, Height=1.6mm, Item Type=Capacitor, Length=3.2mm, Manufacturer Part Number=CL31B102KJHNNNE, Mounting Technology="Surface Mount", Packaging="Tape and Reel", Pricing="1=0.3279, 10=0.1547, 25=0.1532, 100=0.0959, 250=0.095, 500=0.09, 1000=0.0734, 3000=0.0687, 6000=0.0643, 15000=0.0565, 30000=0.0502, 75000=0.0468 (USD)", Radiation Hardening=No, RoHS=Yes, RoHS Compliant=Yes, Series=CL, Stock=125192, Supplier="Arrow Electronics", Supplier Part Number=CL31B102KJHNNNE, Thickness=0.071inch, Width=0.063inch
D18 D19 D20 D21: "DIODE GP 600V 700MA TUMD2SM", Forward Current=700mA, Manufacturer=Rohm, Max Forward Surge Current (Ifsm)=2A, Max Operating Temperature=150°C, Max Repetitive Reverse Voltage (Vrrm)=600V, Supplier Part Number=RRE07VTM6SFHCT-ND, Category="Rectifier Diodes", ComponentLink1Description=http://www.farnell.com/datasheets/2067225.pdf?src-supplier=Farnell, ComponentLink1URL=http://www.farnell.com/datasheets/2067225.pdf?src-supplier=Farnell, ComponentLink2Description=http://www.farnell.com/datasheets/2067225.pdf?src-supplier=Element14, ComponentLink2URL=http://www.farnell.com/datasheets/2067225.pdf?src-supplier=Element14, Manufacturer Part Number=RRE07VTM6SFHTR, Packaging="Cut Tape", Pins=2, Pricing="1=0.43, 10=0.308, 100=0.1552, 500=0.13758, 1000=0.10706 (USD)", Reach SVHC Compliant=No, RoHS=Yes, RoHS Compliant=Yes, Stock=3000, Supplier=Digi-Key
D22 D23 D24 D25 D26: "DIODE GEN PURP 75V 300MA SOD80", Average Rectified Current=300mA, Current Rating=150mA, Manufacturer=Vishay, Max Forward Surge Current (Ifsm)=2A, Max Operating Temperature=175°C, Max Power Dissipation=500mW, Max Repetitive Reverse Voltage (Vrrm)=100V, Max Reverse Voltage (DC)=75V, Min Operating Temperature=-65°C, Package Quantity=1, Supplier Part Number=78-LL4148, Category="Rectifier Diodes", ComponentLink1Description=https://datasheet.ciiva.com/4246/ll4148-4246131.pdf?src-supplier=Arrow+Electronics, ComponentLink1URL=https://datasheet.ciiva.com/4246/ll4148-4246131.pdf?src-supplier=Arrow+Electronics, ComponentLink2Description=https://datasheet.ciiva.com/1243/1353494-1243008.pdf?src-supplier=Newark, ComponentLink2URL=https://datasheet.ciiva.com/1243/1353494-1243008.pdf?src-supplier=Newark, ComponentLink3Description=https://datasheet.ciiva.com/34301/891018-34301682.pdf?src-supplier=Jameco, ComponentLink3URL=https://datasheet.ciiva.com/34301/891018-34301682.pdf?src-supplier=Jameco, ComponentLink4Description=https://datasheet.ciiva.com/1181/1513919-1181029.pdf?src-supplier=Element14, ComponentLink4URL=https://datasheet.ciiva.com/1181/1513919-1181029.pdf?src-supplier=Element14, ComponentLink5Description=https://datasheet.ciiva.com/1243/1699941-1243749.pdf?src-supplier=Newark, ComponentLink5URL=https://datasheet.ciiva.com/1243/1699941-1243749.pdf?src-supplier=Newark, ComponentLink6Description=https://datasheet.ciiva.com/26311/1722544-26311744.pdf?src-supplier=Element14, ComponentLink6URL=https://datasheet.ciiva.com/26311/1722544-26311744.pdf?src-supplier=Element14, ComponentLink7Description=https://datasheet.ciiva.com/1181/1353494-1181031.pdf?src-supplier=Element14, ComponentLink7URL=https://datasheet.ciiva.com/1181/1353494-1181031.pdf?src-supplier=Element14, ComponentLink8Description=https://datasheet.ciiva.com/5829/1513919-5829997.pdf?src-supplier=Farnell, ComponentLink8URL=https://datasheet.ciiva.com/5829/1513919-5829997.pdf?src-supplier=Farnell, ComponentLink9Description=https://datasheet.ciiva.com/13946/ll4148-13946731.pdf?src-supplier=Digi-Key, ComponentLink9URL=https://datasheet.ciiva.com/13946/ll4148-13946731.pdf?src-supplier=Digi-Key, ComponentLink10Description=https://datasheet.ciiva.com/13946/ll4148-13946732.pdf?src-supplier=Digi-Key, ComponentLink10URL=https://datasheet.ciiva.com/13946/ll4148-13946732.pdf?src-supplier=Digi-Key, ComponentLink11Description=https://datasheet.ciiva.com/16298/ll4148-16298094.pdf?src-supplier=Future+Electronics, ComponentLink11URL=https://datasheet.ciiva.com/16298/ll4148-16298094.pdf?src-supplier=Future+Electronics, ComponentLink12Description=https://datasheet.ciiva.com/1181/1353494-1181030.pdf?src-supplier=Element14, ComponentLink12URL=https://datasheet.ciiva.com/1181/1353494-1181030.pdf?src-supplier=Element14, ComponentLink13Description=https://datasheet.ciiva.com/4434/ll4148-105055-4434938.pdf?src-supplier=Mouser, ComponentLink13URL=https://datasheet.ciiva.com/4434/ll4148-105055-4434938.pdf?src-supplier=Mouser, ComponentLink14Description=https://datasheet.ciiva.com/8287/ll4148-8287871.pdf?src-supplier=Avnet, ComponentLink14URL=https://datasheet.ciiva.com/8287/ll4148-8287871.pdf?src-supplier=Avnet, ComponentLink15Description=https://datasheet.ciiva.com/8287/ll4148-8287869.pdf?src-supplier=Avnet, ComponentLink15URL=https://datasheet.ciiva.com/8287/ll4148-8287869.pdf?src-supplier=Avnet, ComponentLink16Description=https://datasheet.ciiva.com/13946/ll4148-13946733.pdf?src-supplier=Digi-Key, ComponentLink16URL=https://datasheet.ciiva.com/13946/ll4148-13946733.pdf?src-supplier=Digi-Key, ComponentLink17Description=https://datasheet.ciiva.com/25936/ll4148-25936391.pdf?, ComponentLink17URL=https://datasheet.ciiva.com/25936/ll4148-25936391.pdf?, Diameter=1.6mm, Forward Current=150mA, Lead Free="Lead Free", Length=3.7mm, Manufacturer Part Number=LL4148-GS08, Mounting Technology="Surface Mount", Outside Diameter=1.5mm, Packaging="Cut Tape", Peak Non-Repetitive Surge Current=2A, Pins=2, Power Dissipation=500mW, Pricing="1=0.14, 10=0.126, 50=0.126, 100=0.06, 500=0.037, 1000=0.028, 2500=0.022, 10000=0.019, 25000=0.017, 50000=0.015 (USD)", Primary Type=SWITCHING, Radiation Hardening=No, Reach SVHC Compliant=Unknown, Reverse Recovery Time=8ns, Reverse Recovery Time-Max=8ns, RoHS=Yes, RoHS Compliant=Yes, Series=-, Stock=423192, Supplier=Mouser, Termination=SMD/SMT, Voltage=100V
J1: "CONN RCPT 20POS SMD GOLD", Manufacturer=Hirose, Supplier Part Number=9113545, Category="Board to Board Connectors", ComponentLink1Description=https://datasheet.octopart.com/FX23-20S-0.5SV-Hirose-datasheet-147827136.pdf?src-supplier=Future+Electronics, ComponentLink1URL=https://datasheet.octopart.com/FX23-20S-0.5SV-Hirose-datasheet-147827136.pdf?src-supplier=Future+Electronics, ComponentLink2Description=https://www.hirose.com/product/en/download_file/key_name/FX23-20S-0.5SV/category/Specification%20Sheet/doc_file_id/88096/?file_category_id=9&item_id=05733201000&is_series=&src-supplier=Digi-Key, ComponentLink2URL=https://www.hirose.com/product/en/download_file/key_name/FX23-20S-0.5SV/category/Specification%20Sheet/doc_file_id/88096/?file_category_id=9&item_id=05733201000&is_series=&src-supplier=Digi-Key, ComponentLink3Description=https://datasheet.octopart.com/FX23-20S-0.5SV-Hirose-datasheet-155938459.pdf?src-supplier=Sager+Electronics, ComponentLink3URL=https://datasheet.octopart.com/FX23-20S-0.5SV-Hirose-datasheet-155938459.pdf?src-supplier=Sager+Electronics, Manufacturer Part Number=FX23-20S-0.5SV, Pricing="84=1.74, 252=1.69, 336=1.68, 840=1.65, 1260=1.61 (USD)", RoHS=Yes, Stock=84, Supplier="Future Electronics"
J2: "CONN HEADER R/A 18POS 2.5MM", Manufacturer="JAE Electronics", Supplier Part Number=435784, Category=Connectors, ComponentLink1Description=https://datasheet.ciiva.com/11754/0900766b80b7ac1f-11754128.pdf?src-supplier=Rs, ComponentLink1URL=https://datasheet.ciiva.com/11754/0900766b80b7ac1f-11754128.pdf?src-supplier=Rs, ComponentLink2Description=https://datasheet.ciiva.com/732/transportation-pg-v2-2-732928.pdf?src-supplier=Digi-Key, ComponentLink2URL=https://datasheet.ciiva.com/732/transportation-pg-v2-2-732928.pdf?src-supplier=Digi-Key, Manufacturer Part Number=MX23A18NF1, Pricing="1=6.45, 10=6.27, 25=6.1, 50=5.93, 75=5.78 (GBP)", RoHS=Yes, Stock=117, Supplier=Rs
J3: "CONN HEADER VERT 24POS 2.54MM", Manufacturer=Samtec, Supplier Part Number=SAM12353-ND, Category=Connectors, ComponentLink1Description=http://www.farnell.com/datasheets/2060109.pdf?src-supplier=Farnell, ComponentLink1URL=http://www.farnell.com/datasheets/2060109.pdf?src-supplier=Farnell, ComponentLink2Description=http://suddendocs.samtec.com/prints/tsw-xxx-xx-xxx-x-xx-xxx-mkt.pdf?src-supplier=Digi-Key, ComponentLink2URL=http://suddendocs.samtec.com/prints/tsw-xxx-xx-xxx-x-xx-xxx-mkt.pdf?src-supplier=Digi-Key, ComponentLink3Description=https://datasheet.octopart.com/TSW-112-15-G-D-Samtec-datasheet-97325576.pdf?src-supplier=Sager+Electronics, ComponentLink3URL=https://datasheet.octopart.com/TSW-112-15-G-D-Samtec-datasheet-97325576.pdf?src-supplier=Sager+Electronics, Manufacturer Part Number=TSW-112-15-G-D, Pricing="1=4.12, 10=3.737, 100=3.2926, 500=2.79872, 1000=2.38714 (USD)", RoHS=Yes, Stock=706, Supplier=Digi-Key
L16 L22: "FERRITE BEAD 600 OHM 0805 1LN", Manufacturer=Murata, Category="Ferrite Beads and Chips", ComponentLink1Description=https://www.murata.com/en-us/api/pdfdownloadapi?cate=luNoiseSupprFilteChipFerriBead&amp;partno=BLM21SP601SH1%23&src-supplier=Digi-Key, ComponentLink1URL=https://www.murata.com/en-us/api/pdfdownloadapi?cate=luNoiseSupprFilteChipFerriBead&amp;partno=BLM21SP601SH1%23&src-supplier=Digi-Key, ComponentLink2Description=https://datasheet.octopart.com/BLM21SP601SH1D-Murata-datasheet-138707483.pdf?src-supplier=Future+Electronics, ComponentLink2URL=https://datasheet.octopart.com/BLM21SP601SH1D-Murata-datasheet-138707483.pdf?src-supplier=Future+Electronics, ComponentLink3Description=https://datasheet.octopart.com/BLM21SP601SH1D-Murata-datasheet-166171483.pdf?src-supplier=TME, ComponentLink3URL=https://datasheet.octopart.com/BLM21SP601SH1D-Murata-datasheet-166171483.pdf?src-supplier=TME, Manufacturer Part Number=BLM21SP601SH1D, Pricing="4000=0.0948 (USD)", RoHS=Yes, Stock=60000, Supplier="Arrow Electronics", Supplier Part Number=BLM21SP601SH1D
L18 L19: "FERRITE BEAD 1K OHM 0805 1LN", Manufacturer=TDK, Category="Ferrite Beads and Chips", ComponentLink1Description=https://datasheet.ciiva.com/46381/1856146-46381611.pdf?src-supplier=Element14, ComponentLink1URL=https://datasheet.ciiva.com/46381/1856146-46381611.pdf?src-supplier=Element14, ComponentLink2Description=https://datasheet.ciiva.com/48682/beads-commercial-power-mpz-en-48682506.pdf?src-supplier=Avnet, ComponentLink2URL=https://datasheet.ciiva.com/48682/beads-commercial-power-mpz-en-48682506.pdf?src-supplier=Avnet, ComponentLink3Description=https://datasheet.ciiva.com/46634/beads-commercial-power-mpz-en-46634366.pdf?src-supplier=Digi-Key, ComponentLink3URL=https://datasheet.ciiva.com/46634/beads-commercial-power-mpz-en-46634366.pdf?src-supplier=Digi-Key, ComponentLink4Description=https://datasheet.ciiva.com/46634/beads-commercial-power-mpz-en-46634422.pdf?src-supplier=Digi-Key, ComponentLink4URL=https://datasheet.ciiva.com/46634/beads-commercial-power-mpz-en-46634422.pdf?src-supplier=Digi-Key, ComponentLink5Description=https://datasheet.ciiva.com/46634/beads-commercial-power-mpz-en-46634424.pdf?src-supplier=Digi-Key, ComponentLink5URL=https://datasheet.ciiva.com/46634/beads-commercial-power-mpz-en-46634424.pdf?src-supplier=Digi-Key, Manufacturer Part Number=MPZ2012S102AT000, Pricing="4000=0.03386, 8000=0.03203, 16000=0.0302, 24000=0.02759, 32000=0.02581 (USD)", RoHS=Yes, Stock=20000, Supplier=Avnet, Supplier Part Number=MPZ2012S102AT000
L20 L21: library part MPZ2012S102AT000, "FERRITE BEAD 1K OHM 0805 1LN", Manufacturer=TDK, Category="Ferrite Beads and Chips", ComponentLink1Description=https://datasheet.ciiva.com/46381/1856146-46381611.pdf?src-supplier=Element14, ComponentLink1URL=https://datasheet.ciiva.com/46381/1856146-46381611.pdf?src-supplier=Element14, ComponentLink2Description=https://datasheet.ciiva.com/48682/beads-commercial-power-mpz-en-48682506.pdf?src-supplier=Avnet, ComponentLink2URL=https://datasheet.ciiva.com/48682/beads-commercial-power-mpz-en-48682506.pdf?src-supplier=Avnet, ComponentLink3Description=https://datasheet.ciiva.com/46634/beads-commercial-power-mpz-en-46634366.pdf?src-supplier=Digi-Key, ComponentLink3URL=https://datasheet.ciiva.com/46634/beads-commercial-power-mpz-en-46634366.pdf?src-supplier=Digi-Key, ComponentLink4Description=https://datasheet.ciiva.com/46634/beads-commercial-power-mpz-en-46634422.pdf?src-supplier=Digi-Key, ComponentLink4URL=https://datasheet.ciiva.com/46634/beads-commercial-power-mpz-en-46634422.pdf?src-supplier=Digi-Key, ComponentLink5Description=https://datasheet.ciiva.com/46634/beads-commercial-power-mpz-en-46634424.pdf?src-supplier=Digi-Key, ComponentLink5URL=https://datasheet.ciiva.com/46634/beads-commercial-power-mpz-en-46634424.pdf?src-supplier=Digi-Key, Manufacturer Part Number=MPZ2012S102AT000, Pricing="4000=0.03386, 8000=0.03203, 16000=0.0302, 24000=0.02759, 32000=0.02581 (USD)", RoHS=Yes, Stock=20000, Supplier=Avnet, Supplier Part Number=MPZ2012S102AT000
L23 L24 L25 L26 L27: "FERRITE BEAD 120 OHM 0805 1LN", Case/Package=0201, Manufacturer=Murata, Max Current Rating=800mA, Max Operating Temperature=125°C, Min Operating Temperature=-55°C, Ratings=AEC-Q200, RMS Current (Irms)=1A, Supplier Part Number=490-BLM21AG121SZ1DCT-ND, Test Frequency=100MHz, Tolerance=25%, Category="Ferrite Beads and Chips", Core Material=228ConductorMaterial, ESR=90mR, Height=1.05mm, Manufacturer Part Number=BLM21AG121SZ1D, Mounting Technology="Surface Mount", Number of Lines=1, Pricing="1=0.19, 10=0.153, 25=0.1188, 50=0.0984, 100=0.0848, 250=0.06788, 500=0.06108, 1000=0.0509 (USD)", RoHS=Yes, RoHS Compliant=Yes, Series="EMIFIL®, BLM21", Stock=3900, Supplier=Digi-Key
Q1 Q2: "TR COUPLER; SO4; AECQ; ROHS; T&R", Manufacturer=Toshiba, Supplier Part Number=264-TLX9000(TPLFDKR-ND, Category=Optocouplers, Manufacturer Part Number=TLX9000(TPL,F, Pricing="1=3.15, 10=2.227, 100=1.8241, 500=1.53772, 1000=1.41046 (USD)", RoHS=No, Supplier=Digi-Key
R1 R2 R3 R8 R9 R10 R15 R28 R29 R31 R33 R35 R37: library part RCA060310K0FKEAHP, "RES SMD 10K OHM 1% 1/10W 0603", Case Code (Imperial)=0603, Case Code (Metric)=1608, Manufacturer="Vishay Dale", Max Operating Temperature=155°C, Max Power Dissipation=250mW, Min Operating Temperature=-55°C, Ratings=AEC-Q200, Supplier Part Number=4171415, Temperature Coefficient=100ppm/°C, Tolerance=1%, Case/Package=0603, Category="Chip SMD Resistors", ComponentLink1Description=http://www.vishay.com/docs/20067/rcahp.pdf?src-supplier=Digi-Key, ComponentLink1URL=http://www.vishay.com/docs/20067/rcahp.pdf?src-supplier=Digi-Key, Features="Automotive AEC-Q200,Anti-Sulfur", Manufacturer Part Number=RCA060310K0FKEAHP, Number of Terminations=2, Packaging="Cut Tape", Pricing="5000=0.0413, 10000=0.0403, 15000=0.0397, 25000=0.0389, 50000=0.0374 (USD)", RoHS=Yes, RoHS Compliant=Yes, Series=RCA-HP, Stock=10000, Supplier="Future Electronics"
R11 R12 R13 R14: library part CRCW04020000Z0ED, "RES SMD 0 OHM JUMPER 1/16W 0402", Case Code (Imperial)=0402, Case Code (Metric)=1005, Manufacturer=Vishay, Max Operating Temperature=155°C, Max Power Dissipation=63mW, Min Operating Temperature=-55°C, Package Quantity=10000, Ratings=AEC-Q200, Resistor Type="Thick Film", Supplier Part Number=71-CRCW0402-0-E3, Temperature Coefficient=100ppm/°C, Tolerance=5%, Voltage Rating=50V, Case/Package=0402, Category="Chip SMD Resistors", ComponentLink1Description=https://datasheet.ciiva.com/7841/1720486-7841802.pdf?src-supplier=Element14, ComponentLink1URL=https://datasheet.ciiva.com/7841/1720486-7841802.pdf?src-supplier=Element14, ComponentLink2Description=https://datasheet.ciiva.com/26311/fld-crcw-e3-data-en-26311550.pdf?src-supplier=Distrelec, ComponentLink2URL=https://datasheet.ciiva.com/26311/fld-crcw-e3-data-en-26311550.pdf?src-supplier=Distrelec, ComponentLink3Description=https://datasheet.ciiva.com/7841/1697337-7841468.pdf?src-supplier=Element14, ComponentLink3URL=https://datasheet.ciiva.com/7841/1697337-7841468.pdf?src-supplier=Element14, ComponentLink4Description=https://datasheet.ciiva.com/2461/dcrcwe3-2461963.pdf?src-supplier=Digi-Key, ComponentLink4URL=https://datasheet.ciiva.com/2461/dcrcwe3-2461963.pdf?src-supplier=Digi-Key, ComponentLink5Description=https://datasheet.ciiva.com/2461/dcrcwe3-2461964.pdf?src-supplier=Digi-Key, ComponentLink5URL=https://datasheet.ciiva.com/2461/dcrcwe3-2461964.pdf?src-supplier=Digi-Key, ComponentLink6Description=https://datasheet.ciiva.com/2461/dcrcwe3-2461962.pdf?src-supplier=Digi-Key, ComponentLink6URL=https://datasheet.ciiva.com/2461/dcrcwe3-2461962.pdf?src-supplier=Digi-Key, ComponentLink7Description=https://datasheet.ciiva.com/16761/70200976-16761309.pdf?src-supplier=Allied+Electronics, ComponentLink7URL=https://datasheet.ciiva.com/16761/70200976-16761309.pdf?src-supplier=Allied+Electronics, ComponentLink8Description=https://datasheet.ciiva.com/3255/dcrcwe3-3255944.pdf?src-supplier=Avnet, ComponentLink8URL=https://datasheet.ciiva.com/3255/dcrcwe3-3255944.pdf?src-supplier=Avnet, Construction=Rectangular, Contact Plating=Tin, Depth=0.5mm, Features="Automotive AEC-Q200", Height=0.35mm, Lead Free="Lead Free", Length=1mm, Manufacturer Part Number=CRCW04020000Z0ED, Military Standard=Not, Number of Terminations=2, Packaging="Tape and Reel", Power Rating=63mW, Pricing="1=0.1, 10=0.017, 50=0.017, 100=0.008, 1000=0.006, 10000=0.004 (USD)", Radiation Hardening=No, Reach SVHC Compliant=Unknown, RoHS=Yes, RoHS Compliant=Yes, Series=CRCW, Stock=2904592, Supplier=Mouser, Termination=SMD/SMT, Voltage Rating (DC)=50V, Weight=2.3E-05oz, Width=0.5mm
R17 R19: library part RC0201DR-07330RL, "RES 330 OHM 0.5% 1/20W 0201", Case/Package=0201, LCSC Part Number=C851717, Manufacturer=Yageo, Max Operating Temperature=125°C, Max Power Dissipation=50mW, Min Operating Temperature=-55°C, Supplier Part Number 1=RC0201DR-07330RL-ND, Temperature Coefficient=200ppm/°C, Tolerance=0.5%, Category="Chip SMD Resistors", ComponentLink1Description=http://www.yageo.com.tw/exep/pages/download/literatures/PYu-R_INT-thick_7.pdf?src-supplier=Digi-Key, ComponentLink1URL=http://www.yageo.com.tw/exep/pages/download/literatures/PYu-R_INT-thick_7.pdf?src-supplier=Digi-Key, Features="Moisture Resistant", Height=0.01inch, Item Type=Resistor, Length=0.024inch, Manufacturer Part Number=RC0201DR-07330RL, Number of Terminations=2, Packaging="Tape and Reel", Pricing 1="10000=0.02267 (USD)", RoHS=Yes, RoHS Compliant=Yes, Series=RC, Supplier 1=Digi-Key, Width=0.012inch
R30 R32 R34 R36: library part AC0603JR-0747KL, "RES SMD 47K OHM 5% 1/10W 0603", Case Code (Imperial)=0603, Case Code (Metric)=1608, Manufacturer=Yageo, Max Operating Temperature=155°C, Max Power Dissipation=100mW, Min Operating Temperature=-55°C, Ratings=AEC-Q200, Supplier Part Number=1055988, Temperature Coefficient=100ppm/°C, Tolerance=5%, Voltage Rating=50V, Case/Package=0603, Category="Chip SMD Resistors", ComponentLink1Description=http://www.mouser.com/ds/2/447/yageodocoutput-1111992.pdf?src-supplier=Mouser, ComponentLink1URL=http://www.mouser.com/ds/2/447/yageodocoutput-1111992.pdf?src-supplier=Mouser, ComponentLink2Description=https://datasheet.octopart.com/AC0603JR-0747KL-Yageo-datasheet-166720450.pdf?src-supplier=Future+Electronics, ComponentLink2URL=https://datasheet.octopart.com/AC0603JR-0747KL-Yageo-datasheet-166720450.pdf?src-supplier=Future+Electronics, Features="Moisture Resistant,Automotive AEC-Q200", Height=0.45mm, Length=1.6mm, Manufacturer Part Number=AC0603JR-0747KL, Number of Terminations=2, Packaging="Tape and Reel", Power Rating=100mW, Pricing="5000=0.0016, 75000=0.0015, 200000=0.0015, 750000=0.0014, 2000000=0.0013 (USD)", RoHS=Yes, RoHS Compliant=Yes, Series=AC, Stock=65000, Supplier="Future Electronics", Termination=SMD/SMT, Width=0.8mm
TP1 TP2 TP3 TP4 TP5 TP6 TP7 TP8 TP9 TP10 TP11 TP12 TP13 TP14 TP15 TP16 TP17 TP18 TP19 TP20: "Test Point ON", Item Type="TEST POINT"
U1: "IC PWR SWITCH N-CHAN 1:1 8SOIC", Manufacturer="Texas Instruments", Supplier Part Number=595-TPS2024IDRQ1, Category="Hot Swap Controllers", ComponentLink1Description=https://datasheet.ciiva.com/3235/tps2022-q1-3235178.pdf?src-supplier=Avnet, ComponentLink1URL=https://datasheet.ciiva.com/3235/tps2022-q1-3235178.pdf?src-supplier=Avnet, ComponentLink2Description=https://datasheet.ciiva.com/1963/tps2022-q1-1963779.pdf?src-supplier=Digi-Key, ComponentLink2URL=https://datasheet.ciiva.com/1963/tps2022-q1-1963779.pdf?src-supplier=Digi-Key, Manufacturer Part Number=TPS2024IDRQ1, Pricing="1=2.71, 10=2.44, 50=2.44, 100=1.96, 1000=1.34, 10000=1.13 (USD)", RoHS=Yes, Stock=4908, Supplier=Mouser
U2: "IC XPND 400KHZ I2C SMBUS 16TSSOP", Manufacturer="Texas Instruments", Supplier Part Number=595-TCA6408AQPWRQ1, Category="Interface ICs", ComponentLink1Description=http://www.ti.com/general/docs/suppproductinfo.tsp?distId=10&amp;gotoUrl=http%3A%2F%2Fwww.ti.com%2Flit%2Fgpn%2Ftca6408a-q1&src-supplier=Digi-Key, ComponentLink1URL=http://www.ti.com/general/docs/suppproductinfo.tsp?distId=10&amp;gotoUrl=http%3A%2F%2Fwww.ti.com%2Flit%2Fgpn%2Ftca6408a-q1&src-supplier=Digi-Key, ComponentLink2Description=http://www.ti.com/lit/ds/symlink/tca6408a-q1.pdf?src-supplier=Digi-Key, ComponentLink2URL=http://www.ti.com/lit/ds/symlink/tca6408a-q1.pdf?src-supplier=Digi-Key, Manufacturer Part Number=TCA6408AQPWRQ1, Pricing="1=1.39, 10=1.22, 50=1.22, 100=0.997, 1000=0.748, 10000=0.643 (USD)", RoHS=Yes, Stock=12699, Supplier=Mouser
U3 U4: "RELAY TELECOM DPDT 1A 12VDC", Manufacturer=Omron, Supplier Part Number=2334168, Category="Signal Relays", Manufacturer Part Number="G6K-2F-Y DC12", Pricing="1=3.1, 10=2.99, 100=2.92, 250=2.78 (GBP)", RoHS=Yes, Stock=2055, Supplier=Rs
U5: "IC PWR DRIVER N-CHAN 1:1 16SOIC", Manufacturer="Texas Instruments", Supplier Part Number=595-TPL7407LADR, Category="Integrated Circuits (ICs)", ComponentLink1Description=http://www.ti.com/lit/ds/symlink/tpl7407la.pdf?src-supplier=Digi-Key, ComponentLink1URL=http://www.ti.com/lit/ds/symlink/tpl7407la.pdf?src-supplier=Digi-Key, ComponentLink2Description=http://www.ti.com/general/docs/suppproductinfo.tsp?distId=10&amp;gotoUrl=http%3A%2F%2Fwww.ti.com%2Flit%2Fgpn%2Ftpl7407la&src-supplier=Digi-Key, ComponentLink2URL=http://www.ti.com/general/docs/suppproductinfo.tsp?distId=10&amp;gotoUrl=http%3A%2F%2Fwww.ti.com%2Flit%2Fgpn%2Ftpl7407la&src-supplier=Digi-Key, Manufacturer Part Number=TPL7407LADR, Pricing="1=0.66, 10=0.544, 50=0.544, 100=0.407, 1000=0.252, 10000=0.197 (USD)", RoHS=Yes, Stock=7225, Supplier=Mouser
U6 U13 U14: "RELAY TELECOM SPST 1A 12VDC", Manufacturer=Omron, Supplier Part Number=G6L-1F-DC12, Category="Signal Relays", ComponentLink1Description=https://datasheet.ciiva.com/2416/g6l-0614-2416511.pdf?src-supplier=Digi-Key, ComponentLink1URL=https://datasheet.ciiva.com/2416/g6l-0614-2416511.pdf?src-supplier=Digi-Key, ComponentLink2Description=https://datasheet.ciiva.com/15185/getdatasheetpartid-153492-15185645.pdf?src-supplier=Verical, ComponentLink2URL=https://datasheet.ciiva.com/15185/getdatasheetpartid-153492-15185645.pdf?src-supplier=Verical, Manufacturer Part Number=G6L-1FDC12, Pricing="1=3.229, 10=2.966, 25=2.652, 50=2.416, 100=2.239, 250=2.053, 500=1.91, 1000=1.756, 5000=1.705 (USD)", RoHS=Yes, Stock=764, Supplier="Arrow Electronics"
U11: "IC ADC 12BIT SIGMA-DELTA 10VSSOP", Case/Package=VSSOP, LCSC Part Number=C193969, Manufacturer="Texas Instruments", Max Operating Temperature=125°C, Max Supply Voltage=5.5V, Min Operating Temperature=-40°C, Min Supply Voltage=2V, Operating Supply Voltage=3.3V, Package Quantity=2500, Power Dissipation=900uW, Supplier Part Number 1=296-41185-1-ND, Category="Analog to Digital Converters (ADCs)", ComponentLink1Description=https://datasheet.ciiva.com/14260/sbas473c-14260076.pdf?src-supplier=Avnet, ComponentLink1URL=https://datasheet.ciiva.com/14260/sbas473c-14260076.pdf?src-supplier=Avnet, ComponentLink2Description=https://datasheet.ciiva.com/6662/ads1013-6662716.pdf?src-supplier=Digi-Key, ComponentLink2URL=https://datasheet.ciiva.com/6662/ads1013-6662716.pdf?src-supplier=Digi-Key, Contact Plating=Gold, Conversion Rate=3.3KS/s, Integral Nonlinearity (INL)=0.5LSB, Interface=I2C, Item Type=IC, Lead Free="Lead Free", Manufacturer Part Number=ADS1015IDGSR, Max Supply Voltage (DC)=5.5V, Min Supply Voltage (DC)=2V, Number of A/D Converters=1, Number of Bits=12, Number of Converters=1, Number of Elements=1, Number of Inputs=4, Number of Pins=10, Packaging="Tape and Reel", Polarity=Bipolar, Pricing 1="1=3.09000, 10=2.77500, 25=2.62360, 100=2.27370, 250=2.15712, 500=1.93556, 1000=1.65000 (USD)", Radiation Hardening=No, Reach SVHC Compliant=Yes, Resolution=12b, RoHS=Yes, RoHS Compliant=Yes, Sampling Rate=3.3KS/s, Series=-, Supplier 1=Digi-Key, Supply Type=Single
U12: "SENSOR MULT HUMIDITY/TEMP", Manufacturer="Texas Instruments", Supplier Part Number=595-HDC2021DEBT, Category="Integrated Circuits (ICs)", Manufacturer Part Number=HDC2021DEBT, Pricing="1=5.04, 10=3.2, 50=3.2, 100=3.1, 1000=2.42, 10000=2.33 (USD)", RoHS=No, Stock=4417, Supplier=Mouser

## Free pads (board coordinates)
  round 6 hole 4: MH0(3.175,3.175) MH0(3.175,116.825) MH0(156.825,3.175) MH0(156.825,116.825)
  round 5.5 hole 3.5: SPACER(140.91,101.86)

## Via types
v1: diameter 0.6, hole 0.3, Top Layer to Bottom Layer, 181 vias

## Nets (pads, with @x,y where several pads share a name; then routed paths per layer and width w, separated by ;. In a path a pad name is that pad's centre, name@x,y a point inside that pad or via, vN(x,y) a via of type N, cw(c..) or ccw(c..) an arc to the next point about the centre after c; other vN are vias at no path point)
12V_START1: J1.14 J2.6 J3.14 | length 7.3
  Top Layer w0.356: v1(3.886,89.985) J1.14@5.562,89.985
  PWR w0.345: 131.318,110.668 131.348,110.638 J2.6@131.348,109.3 131.348,107.818 131.42,107.747
  Bottom Layer w0.345: 4.75,63.195 4.801,63.144 J3.14@6.096,63.144 6.096,64.423
  other v1: 2.819,89.985
+5V-USB: J2.2 L22.2 TP1.1 | length 2.2
  Top Layer w0.508: L22.2@124.908,96.678 TP1.1@127.146,96.678
CH_GND: C30.1 C31.1 C32.1 pad.MH0
  other v1: 132.537,3.124 136.22,3.124 139.868,3.124 143.551,3.124 147.198,3.124 150.881,3.124 8.578,3.175 11.786,3.175 15.469,3.175
DM_RELAY_1: J1.5 J3.5 R17.1 TP19.1 | length 203.4
  Top Layer w0.345: J1.5@11.862,89.485 14.259,89.485 18.019,85.726 18.019,69.935 20.568,67.386 v1(52.619,67.386) 123.347,67.386 125.277,65.456 TP19.1@128.253,65.456 128.304,65.507 R17.1@131.142,65.507
  Bottom Layer w0.345: J3.5@8.636,52.984 22.161,52.984 27.571,47.574 50.622,47.574 52.619,49.571 v1(52.619,67.386)
DM_RELAY_2: J1.6 J3.6 R19.1 TP20.1 | length 179.3
  Top Layer w0.345: J1.6@11.862,88.985 13.938,88.985 17.069,85.854 17.069,68.936 20.472,65.532 v1(53.985,65.532) TP20.1@99.764,65.532 R19.1@102.753,65.532
  Bottom Layer w0.345: J3.6@6.096,52.984 7.378,51.702 21.348,51.702 26.899,46.152 51.749,46.152 53.985,48.388 v1(53.985,65.532)
GND: C1.1 C2.1 C3.1 C4.1 C5.1 C6.2 C7.2 C8.2 C9.1 C10.1 C11.1 C12.1 C13.1 C14.1 C15.2 C16.2 C17.2 C18.1 C19.1 C20.1 C21.1 C22.1 C23.1 C24.1 C25.1 C26.2 C27.2 C30.2 C31.2 C32.2 C33.1 C34.1 J1.1 J1.P3 J1.SH1 J1.SH2 J1.SH3 J1.SH4 J2.1 J2.7 J2.14 J3.1 J3.23 Q1.2 Q1.3 Q2.2 Q2.3 R31.1 R33.1 R35.1 R37.1 U1.1 U2.2 U2.8 U5.8 U11.1 U11.3 U12.2 U12.3 U12.7 | length 57.2